# Altium PCB Driver.PcbDoc (part 1 of 4)
Units mm, origin at the board's own origin, x right, y up, seen from the top; angles counter-clockwise.
Board outline 200.2 x 290.2 mm, 2 copper layers (Top Layer, Bottom Layer), stack 1.371 mm thick; 539 components, 196 nets, 1470 pads, 343 vias.
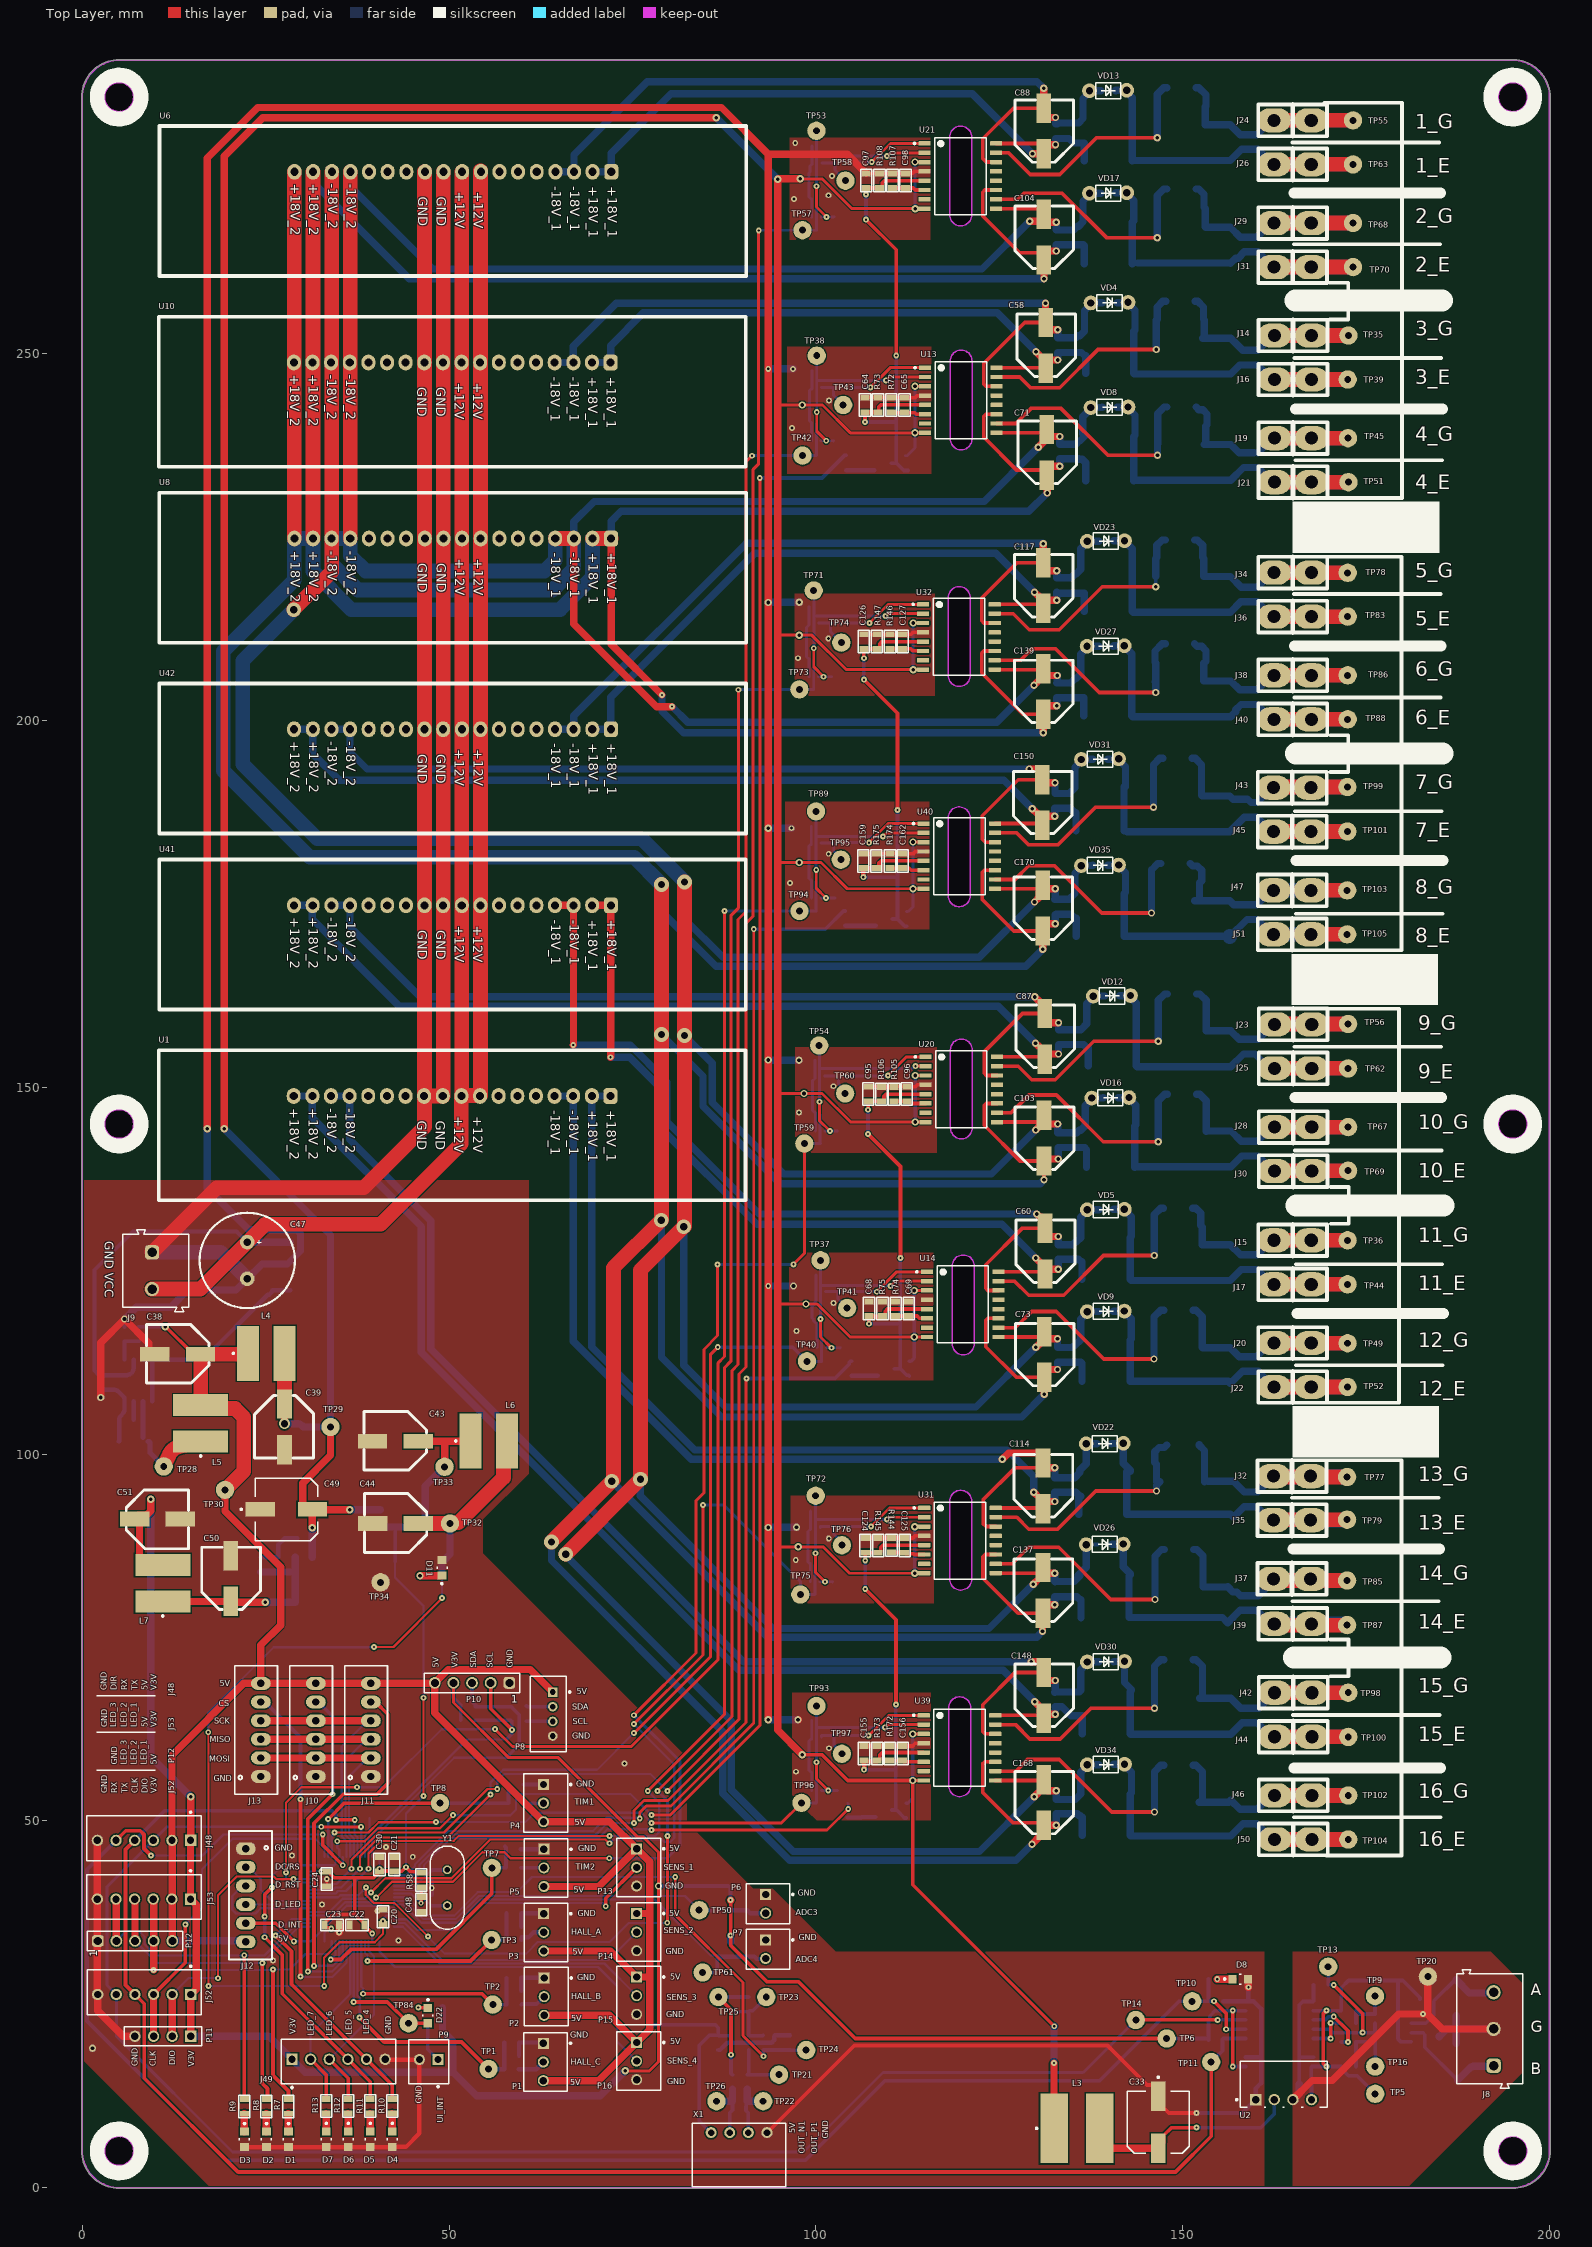
[diagram p0: Top Layer view]
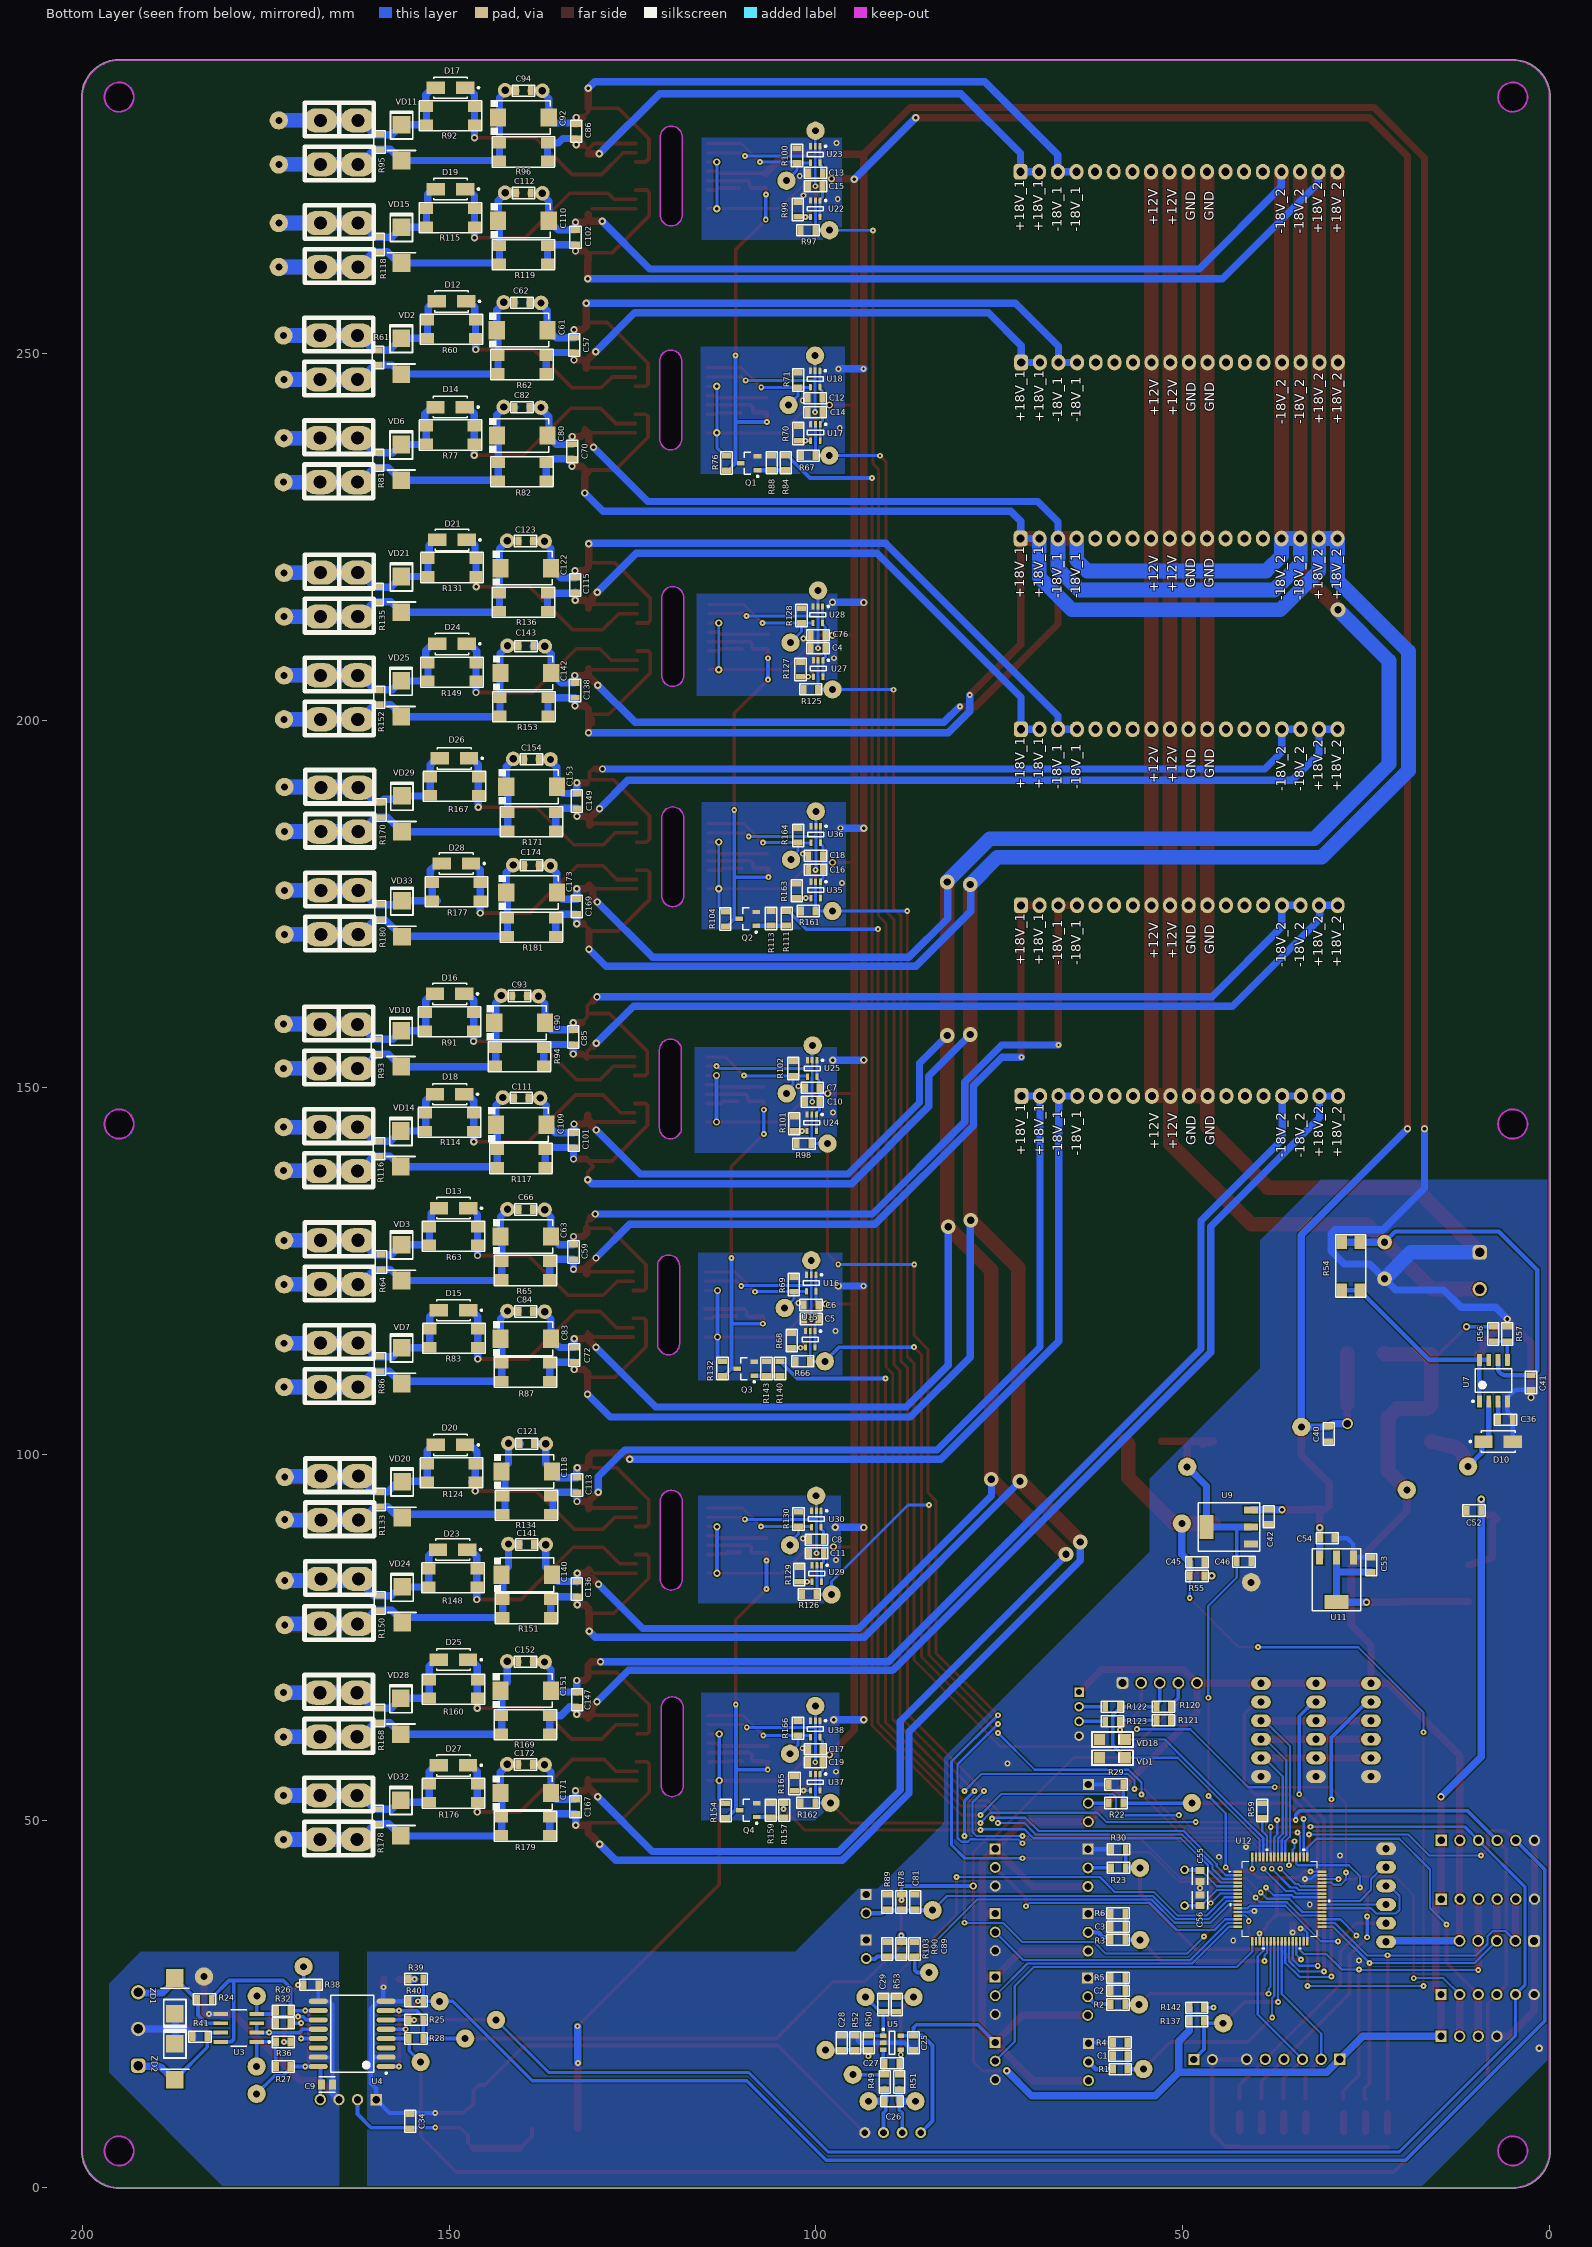
[diagram p1: Bottom Layer view, seen from below]
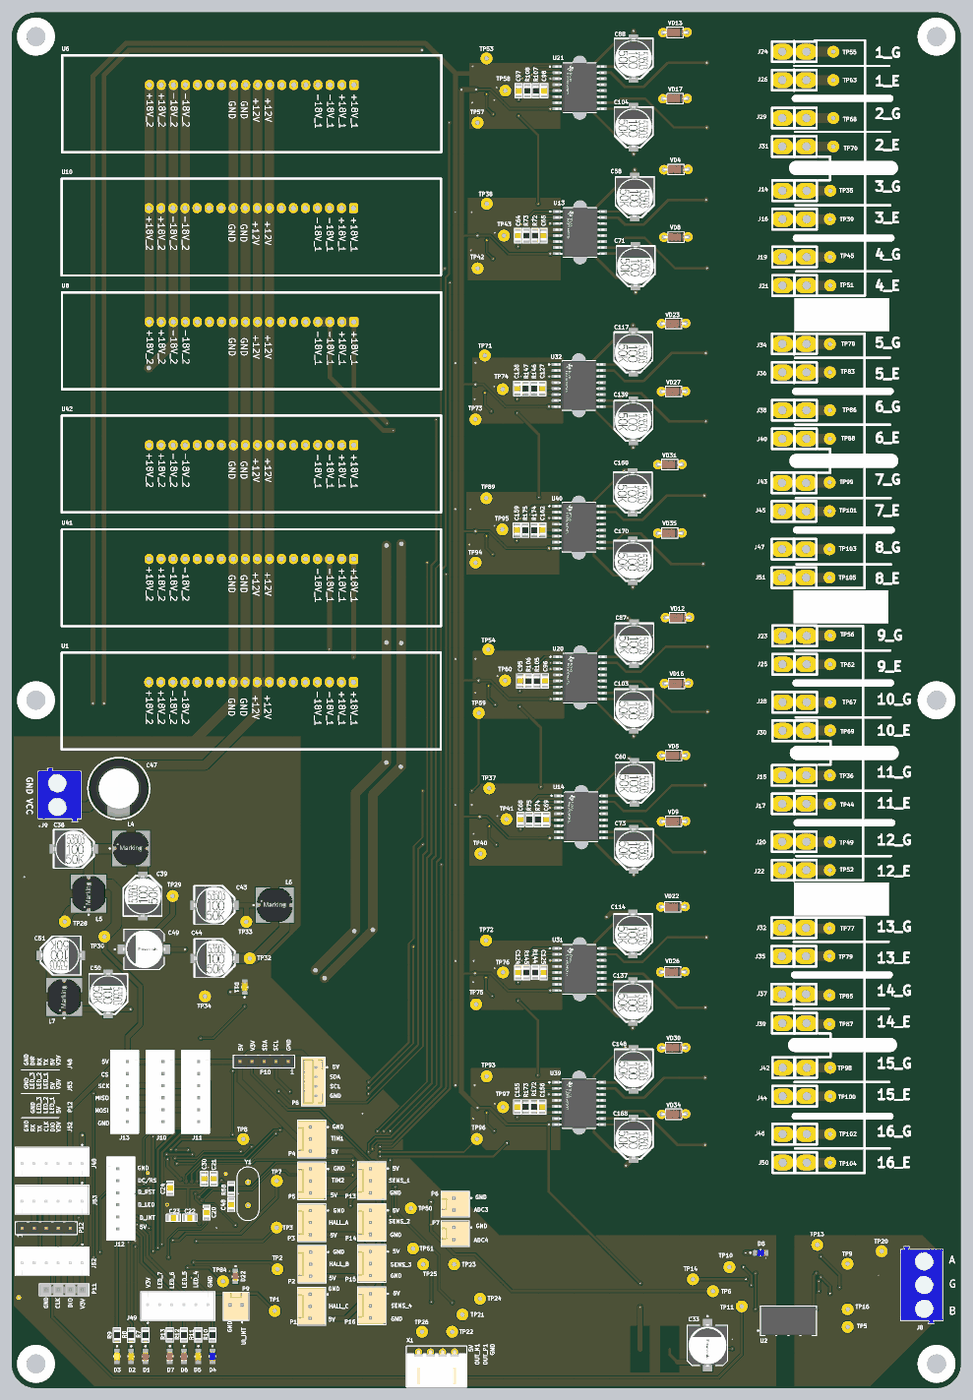
[diagram p5: 3D render of the assembled board from above, using the file's embedded part models]
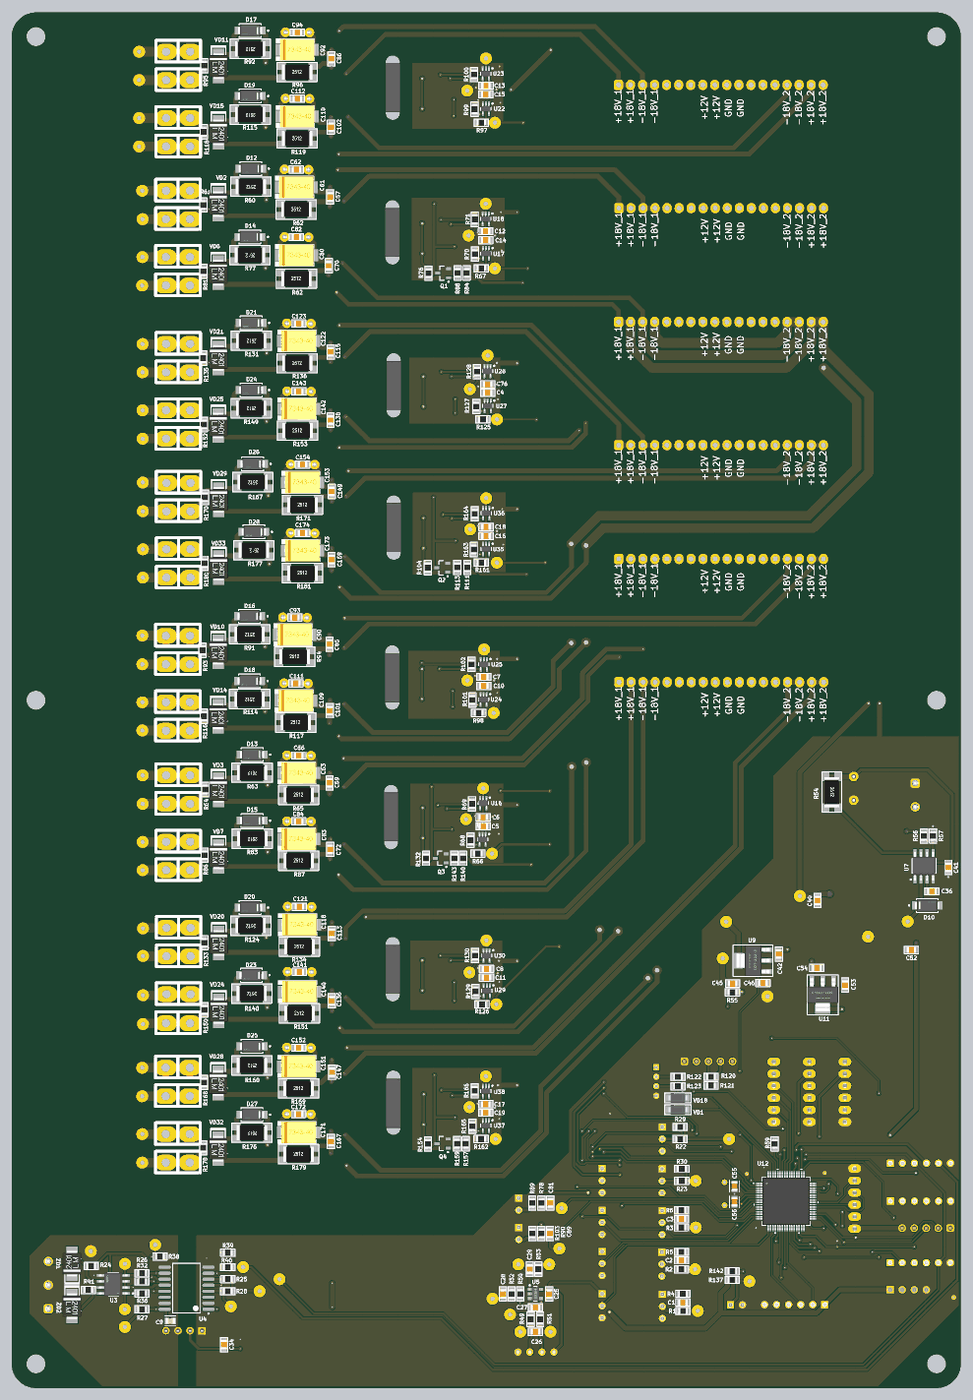
[diagram p6: 3D render of the assembled board from below, using the file's embedded part models]

## Layer stack, top to bottom
Top Solder: solder mask 0.0102, Solder Resist, Dk 3.5
Top Layer: signal copper 0.0356
Dielectric 1: dielectric 1.3, FR-4, Dk 4.8
Bottom Layer: signal copper 0.0356
Bottom Solder: solder mask 0.0102, Solder Resist, Dk 3.5

## Board outline
5,-0.1 cw(c5,5) -0.1,4.994 -0.101,5 -0.1,284.997 -0.1,285 cw(c5,285) 4.997,290.1 5,290.1 195.11,290.1 195.128,290.099 cw(c195,285) 200.1,285.004 200.1,285 200.1,5.003 200.1,5 cw(c195,5) 195,-0.1 194.998,-0.1
cut-out: 193,5 ccw(c195,5) 195,3 ccw(c195,5) 197,5 ccw(c195,5) 195,7 ccw(c195,5)
cut-out: 5,3 cw(c5,5) 3,5 cw(c5,5) 5,7 cw(c5,5) 7,5 cw(c5,5)
cut-out: 5,143 cw(c5,145) 3,145 cw(c5,145) 5,147 cw(c5,145) 7,145 cw(c5,145)
cut-out: 195,143 cw(c195,145) 193,145 cw(c195,145) 195,147 cw(c195,145) 197,145 cw(c195,145)
cut-out: 5,283 cw(c5,285) 3,285 cw(c5,285) 5,287 cw(c5,285) 7,285 cw(c5,285)
cut-out: 195,283 cw(c195,285) 193,285 cw(c195,285) 195,287 cw(c195,285) 197,285 cw(c195,285)
cut-out: 118.23,268.933 118.23,279.532 cw(c119.73,279.532) 121.23,279.532 121.23,268.933 cw(c119.73,268.933)
cut-out: 118.292,238.418 118.292,249.017 cw(c119.792,249.017) 121.292,249.017 121.292,238.418 cw(c119.792,238.418)
cut-out: 118.03,206.144 118.03,216.743 cw(c119.53,216.743) 121.03,216.743 121.03,206.144 cw(c119.53,206.144)
cut-out: 118.023,176.124 ccw(c119.523,176.124) 121.023,176.124 121.023,186.723 ccw(c119.523,186.723) 118.023,186.723
cut-out: 118.585,115.044 ccw(c120.085,115.044) 121.585,115.044 121.585,125.643 ccw(c120.085,125.643) 118.585,125.643
cut-out: 118.334,144.489 ccw(c119.834,144.489) 121.334,144.489 121.334,155.089 ccw(c119.834,155.089) 118.334,155.089
cut-out: 118.234,82.956 ccw(c119.734,82.956) 121.234,82.956 121.234,93.555 ccw(c119.734,93.555) 118.234,93.555
cut-out: 118.094,54.806 118.094,65.405 cw(c119.594,65.405) 121.094,65.405 121.094,54.806 cw(c119.594,54.806)

## Design rules (kind name [scope] priority, off if disabled: settings)
Clearance HV [InNetClass('All Nets') vs InNetClass('HV')] p1: gap=0.2 ignorepadtopadclearanceinfootprint=TRUE except(0: Text-Text Text-Hole; 0.4: THPad-THPad THPad-Via THPad-Fill THPad-Poly THPad-Region THPad-Text THPad-Hole Via-Via Via-Fill Via-Poly Via-Region Via-Text Via-Hole; 0.5: SMDPad-SMDPad SMDPad-THPad SMDPad-Via SMDPad-Fill SMDPad-Poly SMDPad-Region SMDPad-Text SMDPad-Hole Fill-Fill Fill-Poly Fill-Region Fill-Text Fill-Hole Poly-Poly Poly-Region Poly-Text Poly-Hole Region-Region Region-Text Region-Hole)
Clearance Clearance_1 [All] p2: gap=0.18 ignorepadtopadclearanceinfootprint=TRUE
Clearance GND [InNet('GND')] p3: gap=0.4 ignorepadtopadclearanceinfootprint=TRUE except(0.3: Text-Text Text-Hole)
ComponentClearance [All] p1: gap=-2.254 collisioncheckmode=3 verticalgap=0.254 showdistances=FALSE
DiffPairsRouting [All] p1: maxlimit=0.254 minlimit=0.1 mostfreqgap=0.254 toplayer_minwidth=0.3 toplayer_maxwidth=2 toplayer_prefwidth=0.3 bottomlayer_minwidth=0.3 bottomlayer_maxwidth=2 bottomlayer_prefwidth=0.3 maxuncoupledlength=12.7
Height [All] p1: minheight=0 maxheight=100 prefheight=12.7
HoleSize [All] p1: absolutevalues=TRUE maxlimit=5 minlimit=0.025 maxpercent=80.000 minpercent=20.000
HoleToHoleClearance [All] p1: gap=0 allowstackedmicrovias=TRUE
LayerPairs [All] p1 off: enforce=TRUE
MinimumSolderMaskSliver [All] p1: minsoldermaskwidth=0.01
PlaneClearance [All] p1: clearance=0.4
PlaneConnect [All] p1: planeconnectstyle=Direct reliefexpansion=0.508 reliefentries=4 reliefconductorwidth=0.254 reliefairgap=0.254
PolygonConnect [All] p1: connectstyle=Direct reliefconductorwidth=0.254 reliefentries=4 polygonreliefangle="90 Angle" airgapwidth=0.254
RoutingCorners [All] p1: cornerstyle=45-Degree minsetback=0.2 maxsetback=0.2
RoutingVias [All] p1: holewidth=0.4 width=0.8 viastyle="Through Hole" minholewidth=0.254 minwidth=0.5 maxholewidth=0.75 maxwidth=1.5
ShortCircuit [All] p1: allowed=TRUE
SilkToSilkClearance [All] p1 off: silktosilkclearance=0.01
SilkToSolderMaskClearance [All] p1: minsilkscreentomaskgap=0 clearancetoexposedcopper=FALSE
SolderMaskExpansion [All] p1: expansion=0 istentingtop=FALSE
UnRoutedNet [All] p1: checkbadconnections=TRUE
Width [All] p1: maxlimit=10 minlimit=0.254 preferedwidth=2
16 further rules are at their usual default settings.

## Components (designator, comment, footprint, x,y, rotation, side; value= is the part's Value field where it differs from the comment)
C1 "330pF" CAP-0805 58.522,17.957 r180 bottom
C2 "330pF" CAP-0805 58.826,26.832 r180 bottom
C3 "330pF" CAP-0805 58.823,35.552 r180 bottom
C4 "0.1uF" CAP-0805 99.701,209.861 r180 bottom
C5 "0.1uF" CAP-0805 100.636,118.419 r180 bottom
C6 "0.1uF" CAP-0805 100.656,120.315 r180 bottom
C7 "0.1uF" CAP-0805 100.507,149.929 r180 bottom
C8 "0.1uF" CAP-0805 99.939,88.336 r180 bottom
C9 "C0805C224K5RACTU" FP-C0805C-DN-MFG 166.646,14.072 r180 bottom value="0.22 μF"
C10 "0.1uF" CAP-0805 100.507,148.029 r180 bottom
C11 "0.1uF" CAP-0805 99.939,86.487 r180 bottom
C12 "0.1uF" CAP-0805 100.141,243.961 r180 bottom
C13 "0.1uF" CAP-0805 100.067,274.668 r180 bottom
C14 "0.1uF" CAP-0805 100.112,242.041 r180 bottom
C15 "0.1uF" CAP-0805 100.08,272.84 r180 bottom
C16 "0.1uF" CAP-0805 100.044,179.652 r180 bottom
C17 "0.1uF" CAP-0805 100.084,59.77 r180 bottom
C18 "0.1uF" CAP-0805 100.044,181.555 r180 bottom
C19 "0.1uF" CAP-0805 100.084,57.98 r180 bottom
C20 "CAP-NON-POLAR" CAP-0805 40.991,36.924 r270 top
C21 "CAP-NON-POLAR" CAP-0805 42.505,44.073 r90 top
C22 "CAP-NON-POLAR" CAP-0805 37.453,35.797 r180 top
C23 "CAP-NON-POLAR" CAP-0805 34.007,35.798 r0 top
C24 "CAP-NON-POLAR" CAP-0805 33.316,42.076 r270 top
C25 "0.1uF" CAP-0805 86.703,19.755 r90 bottom locked
C26 "0.1uF" CAP-0805 89.63,11.775 r0 bottom locked
C27 "0.1uF" CAP-0805 89.63,16.932 r0 bottom locked
C28 "1000pF" CAP-0805 96.469,19.749 r270 bottom locked
C29 "0.1uF" CAP-0805 90.81,24.975 r270 bottom locked
C30 "CAP-NON-POLAR" CAP-0805 40.507,44.073 r90 top
C33 "1000uF_10V" CAP_SMD_Size_G 146.675,8.901 r270 top locked
C34 "CAP-NON-POLAR" CAP-0805 155.325,9.05 r270 bottom
C36 "470pF" CAP-0805 6.005,104.691 r180 bottom
C38 "330uF 16V" CAP_SMD_Size_E 12.925,113.629 r0 top
C39 "1000uF 6.3V" CAP_SMD_Size_E 27.55,103.647 r90 top locked
C40 "0.1uF" CAP-0805 30.1,102.739 r90 bottom
C41 "0.47uF" CAP-0805 2.52,109.749 r270 bottom
C42 "0.1uF" CAP-0805 38.27,91.459 r90 bottom
C43 "1000uF_6.3V" CAP_SMD_Size_E 42.59,101.759 r0 top
C44 "1000uF_6.3V" CAP_SMD_Size_E 42.63,90.534 r0 top
C45 "0.1uF" CAP-0805 48.035,85.247 r0 bottom
C46 "0.1uF" CAP-0805 41.63,85.339 r0 bottom
C47 "25V_2200uF" CAPPOL-12x25 22.475,126.4 r270 top
C48 "0.1uF" CAP-0805 46.195,38.594 r90 top
C49 "1000uF_10V" CAP_SMD_Size_G 27.81,92.459 r0 top locked
C50 "1000uF_6.3V" CAP_SMD_Size_E 20.21,83.109 r270 top locked
C51 "1000uF_6.3V" CAP_SMD_Size_E 10.3,91.159 r180 top
C52 "0.1uF" CAP-0805 10.3,92.302 r180 bottom
C53 "0.1uF" CAP-0805 24.31,84.919 r270 bottom
C54 "0.1uF" CAP-0805 30.29,88.539 r0 bottom
C55 "16pF" FP-GRM21B-0_1-IPC_C 47.627,42.476 r270 bottom
C56 "16pF" FP-GRM21B-0_1-IPC_C 47.627,39.186 r90 bottom
C57 "CAP-NON-POLAR" CAP-0805 132.942,251.188 r270 bottom
C58 "100uF_50V" CAP_SMD_Size_E 131.322,251.228 r270 top
C59 "CAP-NON-POLAR" CAP-0805 133.056,127.559 r270 bottom
C60 "100uF_50V" CAP_SMD_Size_E 131.236,127.719 r270 top
C61 "CAP-POLAR" CAP-TAN-D 140.056,253.233 r180 bottom
C62 "CAP-NON-POLAR" CAP-0805 140.056,256.956 r0 bottom
C63 "CAP-POLAR" CAP-TAN-D 139.556,129.659 r180 bottom
C64 "CAP-NON-POLAR" CAP-0805 106.683,243.012 r270 top
C65 "CAP-NON-POLAR" CAP-0805 112.072,243.012 r270 top
C66 "CAP-NON-POLAR" CAP-0805 139.556,133.339 r0 bottom
C68 "CAP-NON-POLAR" CAP-0805 107.238,119.824 r270 top
C69 "CAP-NON-POLAR" CAP-0805 112.645,119.824 r270 top
C70 "CAP-NON-POLAR" CAP-0805 133.222,236.678 r270 bottom
C71 "100uF_50V" CAP_SMD_Size_E 131.472,236.628 r270 top
C72 "CAP-NON-POLAR" CAP-0805 132.926,113.529 r270 bottom
C73 "100uF_50V" CAP_SMD_Size_E 131.126,113.634 r270 top
C76 "0.1uF" CAP-0805 99.701,211.641 r180 bottom
C80 "CAP-POLAR" CAP-TAN-D 140.042,238.868 r180 bottom
C81 "330pF" CAP-0805 86.478,38.931 r270 bottom
C82 "CAP-NON-POLAR" CAP-0805 140.056,242.698 r0 bottom
C83 "CAP-POLAR" CAP-TAN-D 139.556,115.734 r180 bottom
C84 "CAP-NON-POLAR" CAP-0805 139.556,119.449 r0 bottom
C85 "CAP-NON-POLAR" CAP-0805 133.064,156.839 r270 bottom
C86 "CAP-NON-POLAR" CAP-0805 132.68,280.343 r270 bottom
C87 "100uF_50V" CAP_SMD_Size_E 131.194,157.019 r270 top
C88 "100uF_50V" CAP_SMD_Size_E 131.05,280.435 r270 top
C89 "330pF" CAP-0805 86.548,32.505 r270 bottom
C90 "CAP-POLAR" CAP-TAN-D 140.394,158.799 r180 bottom
C92 "CAP-POLAR" CAP-TAN-D 139.87,282.223 r180 bottom
C93 "CAP-NON-POLAR" CAP-0805 140.394,162.459 r0 bottom
C94 "CAP-NON-POLAR" CAP-0805 139.87,285.883 r0 bottom
C95 "CAP-NON-POLAR" CAP-0805 107.144,149.079 r270 top
C96 "CAP-NON-POLAR" CAP-0805 112.404,149.079 r270 top
C97 "CAP-NON-POLAR" CAP-0805 106.847,273.603 r270 top
C98 "CAP-NON-POLAR" CAP-0805 112.22,273.603 r270 top
C101 "CAP-NON-POLAR" CAP-0805 133.004,142.789 r270 bottom
C102 "CAP-NON-POLAR" CAP-0805 132.77,265.883 r270 bottom
C103 "100uF_50V" CAP_SMD_Size_E 131.104,143.139 r270 top
C104 "100uF_50V" CAP_SMD_Size_E 131.05,265.973 r270 top
C109 "CAP-POLAR" CAP-TAN-D 140.174,144.895 r180 bottom
C110 "CAP-POLAR" CAP-TAN-D 139.87,268.143 r180 bottom
C111 "CAP-NON-POLAR" CAP-0805 140.174,148.559 r0 bottom
C112 "CAP-NON-POLAR" CAP-0805 139.87,271.913 r0 bottom
C113 "CAP-NON-POLAR" CAP-0805 132.574,95.793 r270 bottom
C114 "100uF_50V" CAP_SMD_Size_E 130.954,95.745 r270 top
C115 "CAP-NON-POLAR" CAP-0805 132.81,218.484 r270 bottom
C117 "100uF_50V" CAP_SMD_Size_E 131,218.464 r270 top
C118 "CAP-POLAR" CAP-TAN-D 139.414,97.635 r180 bottom
C121 "CAP-NON-POLAR" CAP-0805 139.414,101.425 r0 bottom
C122 "CAP-POLAR" CAP-TAN-D 139.57,220.784 r180 bottom
C123 "CAP-NON-POLAR" CAP-0805 139.57,224.474 r0 bottom
C124 "CAP-NON-POLAR" CAP-0805 106.734,87.555 r270 top
C125 "CAP-NON-POLAR" CAP-0805 112.104,87.555 r270 top
C126 "CAP-NON-POLAR" CAP-0805 106.54,210.758 r270 top
C127 "2.2nF" CAP-0805 111.82,210.759 r270 top
C136 "CAP-NON-POLAR" CAP-0805 132.584,81.605 r270 bottom
C137 "100uF_50V" CAP_SMD_Size_E 130.954,81.482 r270 top
C138 "CAP-NON-POLAR" CAP-0805 132.85,204.114 r270 bottom
C139 "100uF_50V" CAP_SMD_Size_E 131,204.034 r270 top
C140 "CAP-POLAR" CAP-TAN-D 139.414,83.535 r180 bottom
C141 "CAP-NON-POLAR" CAP-0805 139.414,87.685 r0 bottom
C142 "CAP-POLAR" CAP-TAN-D 139.54,206.483 r180 bottom
C143 "CAP-NON-POLAR" CAP-0805 139.54,210.153 r0 bottom
C147 "CAP-NON-POLAR" CAP-0805 132.538,66.509 r270 bottom
C148 "100uF_50V" CAP_SMD_Size_E 131.074,67.175 r270 top
C149 "CAP-NON-POLAR" CAP-0805 132.593,189.054 r270 bottom
C150 "100uF_50V" CAP_SMD_Size_E 130.873,188.894 r270 top
C151 "CAP-POLAR" CAP-TAN-D 139.574,67.759 r180 bottom
C152 "CAP-NON-POLAR" CAP-0805 139.574,71.689 r0 bottom
C153 "CAP-POLAR" CAP-TAN-D 138.763,190.964 r180 bottom
C154 "CAP-NON-POLAR" CAP-0805 138.763,194.724 r0 bottom
C155 "CAP-NON-POLAR" CAP-0805 106.564,59.205 r270 top
C156 "CAP-NON-POLAR" CAP-0805 111.824,59.205 r270 top
C159 "CAP-NON-POLAR" CAP-0805 106.463,180.879 r270 top
C162 "CAP-NON-POLAR" CAP-0805 111.843,180.879 r270 top
C167 "CAP-NON-POLAR" CAP-0805 132.774,51.915 r270 bottom
C168 "100uF_50V" CAP_SMD_Size_E 131.074,52.555 r270 top
C169 "CAP-NON-POLAR" CAP-0805 132.623,174.654 r270 bottom
C170 "100uF_50V" CAP_SMD_Size_E 130.933,174.484 r270 top
C171 "CAP-POLAR" CAP-TAN-D 139.574,53.805 r180 bottom
C172 "CAP-NON-POLAR" CAP-0805 139.574,57.675 r0 bottom
C173 "CAP-POLAR" CAP-TAN-D 138.763,176.564 r180 bottom
C174 "CAP-NON-POLAR" CAP-0805 138.763,180.254 r0 bottom
D1 "151031YS06000" LED_RED 28.081,6.576 r270 top
D2 "151031YS06000" LED_GREEN 25.081,6.576 r270 top
D3 "151031YS06000" LED_YELLOW 22.081,6.576 r270 top
D4 "151031YS06000" LED_BLUE 42.231,6.601 r270 top
D5 "151031YS06000" LED_GREEN 39.231,6.601 r270 top
D6 "151031YS06000" LED_RED 36.231,6.601 r270 top
D7 "151031YS06000" LED_RED 33.231,6.601 r270 top
D8 "LED" LED_BLUE 157.868,28.417 r0 top
D10 "US1G" US1G_SMA 6.98,101.709 r180 bottom
D11 "151031YS06000" LED_GREEN 49.035,84.485 r90 top
D12 "US1G" US1G_SMA 149.672,257.148 r0 bottom
D13 "US1G" US1G_SMA 149.391,133.525 r0 bottom
D14 "US1G" US1G_SMA 149.856,242.738 r0 bottom
D15 "US1G" US1G_SMA 149.406,119.609 r0 bottom
D16 "US1G" US1G_SMA 149.934,162.729 r0 bottom
D17 "US1G" US1G_SMA 149.81,286.273 r0 bottom
D18 "US1G" US1G_SMA 149.934,149.059 r0 bottom
D19 "US1G" US1G_SMA 149.81,272.463 r0 bottom
D20 "US1G" US1G_SMA 149.829,101.248 r0 bottom
D21 "US1G" US1G_SMA 149.605,224.619 r0 bottom
D22 "151031YS06000" LED_RED 47.087,23.458 r270 top
D23 "US1G" US1G_SMA 149.524,86.985 r0 bottom
D24 "US1G" US1G_SMA 149.61,210.464 r0 bottom
D25 "US1G" US1G_SMA 149.424,71.975 r0 bottom
D26 "US1G" US1G_SMA 149.293,194.854 r0 bottom
D27 "US1G" US1G_SMA 149.424,57.565 r0 bottom
D28 "US1G" US1G_SMA 149.023,180.514 r0 bottom
J8 "" 691101710003 191.888,21.627 r90 top
J9 "691101710002" 691101710002 10,125 r270 top locked
J10 "B6B-XH-TW" B6B-XH-TW 31.193,62.387 r90 top
J11 "B6B-XH-TW" B6B-XH-TW 38.693,62.387 r90 top
J12 "B6B-XH-TW" B6B-XH-TW 22.907,39.857 r270 top
J13 "B6B-XH-TW" B6B-XH-TW 23.693,62.387 r90 top
J14 "G(4)" Klema_PCB_15A 165.042,252.498 r180 top
J15 "G" Klema_PCB_15A 164.986,129.149 r180 top
J16 "E(5)" Klema_PCB_15A 165.042,246.498 r180 top
J17 "E" Klema_PCB_15A 164.986,123.149 r180 top
J19 "G(6)" Klema_PCB_15A 165.042,238.498 r180 top
J20 "G" Klema_PCB_15A 164.986,115.149 r180 top
J21 "E(7)" Klema_PCB_15A 165.042,232.498 r180 top
J22 "E" Klema_PCB_15A 164.986,109.149 r180 top
J23 "G" Klema_PCB_15A 165.054,158.579 r180 top
J24 "G" Klema_PCB_15A 164.99,281.823 r180 top
J25 "E" Klema_PCB_15A 165.054,152.579 r180 top
J26 "E" Klema_PCB_15A 164.99,275.823 r180 top
J28 "G" Klema_PCB_15A 165.054,144.579 r180 top
J29 "G" Klema_PCB_15A 164.99,267.823 r180 top
J30 "E" Klema_PCB_15A 165.054,138.579 r180 top
J31 "E" Klema_PCB_15A 164.99,261.823 r180 top
J32 "G" Klema_PCB_15A 164.914,96.985 r180 top
J34 "G" Klema_PCB_15A 165,220.174 r180 top
J35 "E" Klema_PCB_15A 164.914,90.985 r180 top
J36 "E" Klema_PCB_15A 165,214.174 r180 top
J37 "G" Klema_PCB_15A 164.914,82.985 r180 top
J38 "G" Klema_PCB_15A 165,206.174 r180 top
J39 "E" Klema_PCB_15A 165.024,76.855 r180 top
J40 "E" Klema_PCB_15A 165,200.174 r180 top
J42 "G" Klema_PCB_15A 165.074,67.465 r180 top
J43 "G" Klema_PCB_15A 164.933,190.854 r180 top
J44 "E" Klema_PCB_15A 165.074,61.465 r180 top
J45 "E" Klema_PCB_15A 164.933,184.854 r180 top
J46 "G" Klema_PCB_15A 165.074,53.465 r180 top
J47 "G" Klema_PCB_15A 164.933,176.854 r180 top
J48 "" Sullins_SWR25X-NRTC-S06-ST-BA_MFG 8.397,47.632 r180 top
J49 "" Sullins_SWR25X-NRTC-S06-ST-BA_MFG 34.927,17.196 r0 top
J50 "E" Klema_PCB_15A 165.074,47.465 r180 top
J51 "E" Klema_PCB_15A 164.933,170.854 r180 top
J52 "" Sullins_SWR25X-NRTC-S06-ST-BA_MFG 8.432,26.632 r180 top
J53 "" Sullins_SWR25X-NRTC-S06-ST-BA_MFG 8.387,39.632 r180 top
L3 "744776227" WE-PD2_1054 1405.585,1278.074 r0 top
L4 "744776227" WE-PD2_7850 25.05,113.729 r0 top
L5 "220uH" WE-PD2_7850 16.12,104.209 r90 top
L6 "1000µH, 0.3A" WE-PD2_7850 55.38,101.789 r0 top
L7 "1000µH, 0.3A" WE-PD2_7850 10.96,82.399 r90 top
P1 "61900311121" 61900311121 63.142,17.127 r90 top
P2 "61900311121" 61900311121 63.243,26.027 r90 top
P3 "61900311121" 61900311121 63.193,34.802 r90 top
P4 "61900311121" 61900311121 63.167,52.421 r90 top
P5 "61900311121" 61900311121 63.217,43.591 r90 top
P6 "61900211121" 61900211121 93.453,38.695 r90 top
P7 "61900211121" 61900211121 93.443,32.495 r90 top
P8 "62000411622" 62000411622 63.522,64.561 r90 top
P9 "61900211121" 61900211121 47.217,17.156 r0 top locked
P10 "61300511121" 61300511121 53.122,68.807 r180 top
P11 "TSW-104-08-G-S" SMTC-TSW-104-08-X-S 14.782,20.632 r180 top
P12 "61300511121" 61300511121 7.177,33.632 r0 top
P13 "61900311121" 61900311121 75.855,43.65 r90 top
P14 "61900311121" 61900311121 75.855,34.835 r90 top
P15 "61900311121" 61900311121 75.855,26.165 r90 top
P16 "61900311121" 61900311121 75.855,17.25 r90 top
Q1 "BC847C" INF-SOT23_N 109.1,235.097 r0 bottom
Q2 "BC847C" INF-SOT23_N 109.291,172.957 r0 bottom
Q3 "BC847C" INF-SOT23_N 109.566,111.654 r0 bottom
Q4 "BC847C" INF-SOT23_N 109.229,51.47 r0 bottom
R1 "10K" RES-0805 58.511,16.147 r180 bottom
R2 "10K" RES-0805 58.826,24.951 r180 bottom
R3 "10K" RES-0805 58.823,33.784 r180 bottom
R4 "10K" RES-0805 58.522,19.787 r0 bottom
R5 "10K" RES-0805 58.826,28.62 r0 bottom
R6 "10K" RES-0805 58.823,37.384 r0 bottom
R7 "220" RES-0805 28.081,11.076 r90 top
R8 "220" RES-0805 25.081,11.076 r90 top
R9 "220" RES-0805 22.081,11.076 r90 top
R10 "220" RES-0805 42.231,11.101 r90 top
R11 "220" RES-0805 39.231,11.101 r90 top
R12 "220" RES-0805 36.231,11.101 r90 top
R13 "220" RES-0805 33.231,11.101 r90 top
R22 "20K" RES-0805 59.087,52.421 r180 bottom
R23 "20K" RES-0805 58.757,43.591 r180 bottom
R24 "10K" RES-0805 183.358,25.657 r180 bottom
R25 "10K" RES-0805 154.528,22.862 r180 bottom
R26 "10K" RES-0805 172.618,24.132 r180 bottom
R27 "10K" RES-0805 172.618,16.517 r180 bottom
R28 "10K" RES-0805 154.528,20.322 r180 bottom
R29 "30K" RES-0805 59.087,54.961 r180 bottom
R30 "30K" RES-0805 58.757,46.131 r180 bottom
R32 "100" RES-0805 172.618,22.402 r180 bottom
R36 "100" RES-0805 172.618,19.862 r180 bottom
R38 "10K" RES-0805 168.838,27.637 r0 bottom
R39 "220" RES-0805 154.528,28.437 r180 bottom
R40 "10K" RES-0805 154.528,25.402 r180 bottom
R41 "10K" RES-0805 183.958,20.587 r180 bottom
R49 "10K" RES-0805 90.63,14.405 r90 bottom locked
R50 "1K" RES-0805 92.81,19.755 r90 bottom locked
R51 "10K" RES-0805 88.62,14.405 r90 bottom locked
R52 "47K" RES-0805 94.65,19.755 r90 bottom locked
R53 "10K" RES-0805 89,24.975 r270 bottom locked
R54 "0.33" RES-2512 27.1,125.6 r270 bottom
R55 "220" RES-0805 48.065,83.377 r0 bottom
R56 "3.8K" RES-0805 7.64,116.369 r270 bottom
R57 "1.2K" RES-0805 5.74,116.369 r270 bottom
R58 "10K" RES-0805 46.195,41.924 r90 top
R59 "10K" RES-0805 39.159,51.407 r270 bottom
R60 "10" RES-2512 149.672,253.358 r0 bottom
R61 "10K" RES-0805 159.692,249.478 r90 bottom
R62 "1K" RES-2512 140.056,248.538 r180 bottom
R63 "10" RES-2512 149.411,129.725 r0 bottom
R64 "10K" RES-0805 159.296,126.169 r90 bottom
R65 "1K" RES-2512 139.556,125.024 r180 bottom
R66 "10K" RES-0805 101.785,112.644 r180 bottom
R67 "10K" RES-0805 101.051,236.121 r180 bottom
R68 "10K" RES-0805 103.309,115.484 r270 bottom
R69 "10K" RES-0805 103.006,123.139 r270 bottom
R70 "10K" RES-0805 102.391,239.141 r270 bottom
R71 "10K" RES-0805 102.421,246.431 r270 bottom
R72 "100K" RES-0805 110.263,243.012 r270 top
R73 "10K" RES-0805 108.473,243.022 r270 top
R74 "100K" RES-0805 110.868,119.824 r270 top
R75 "10K" RES-0805 109.065,119.824 r270 top
R76 "3K" RES-0805 112.187,235.097 r270 bottom
R77 "10" RES-2512 149.856,238.928 r0 bottom
R78 "10K" RES-0805 88.349,38.931 r90 bottom
R81 "10K" RES-0805 159.672,235.498 r90 bottom
R82 "1K" RES-2512 140.042,233.928 r180 bottom
R83 "10" RES-2512 149.376,115.799 r0 bottom
R84 "1K" RES-0805 104.119,235.147 r270 bottom
R86 "10K" RES-0805 159.426,112.289 r90 bottom
R87 "1K" RES-2512 139.556,111.139 r180 bottom
R88 "10K" RES-0805 106.04,235.147 r90 bottom
R89 "47K" RES-0805 90.278,38.931 r90 bottom
R90 "10K" RES-0805 88.368,32.505 r90 bottom
R91 "10" RES-2512 149.934,158.919 r0 bottom
R92 "10" RES-2512 149.81,282.443 r0 bottom
R93 "10K" RES-0805 159.854,155.549 r90 bottom
R94 "1K" RES-2512 140.394,154.179 r180 bottom
R95 "10K" RES-0805 159.5,278.873 r90 bottom
R96 "1K" RES-2512 139.87,277.513 r180 bottom
R97 "10K" RES-0805 101.06,266.847 r180 bottom
R98 "10K" RES-0805 101.614,142.329 r180 bottom
R99 "10K" RES-0805 102.46,269.686 r270 bottom
R100 "10K" RES-0805 102.59,277.027 r270 bottom
R101 "10K" RES-0805 102.934,145.039 r270 bottom
R102 "10K" RES-0805 103.1,152.569 r270 bottom
R103 "47K" RES-0805 90.268,32.505 r90 bottom
R104 "3K" RES-0805 112.348,172.957 r270 bottom
R105 "100K" RES-0805 110.654,149.049 r270 top
R106 "10K" RES-0805 108.934,149.049 r270 top
R107 "100K" RES-0805 110.45,273.603 r270 top
R108 "10K" RES-0805 108.667,273.603 r270 top
R111 "1K" RES-0805 103.989,173.037 r270 bottom
R113 "10K" RES-0805 106.122,173.037 r90 bottom
R114 "10" RES-2512 149.934,145.249 r0 bottom
R115 "10" RES-2512 149.81,268.563 r0 bottom
R116 "10K" RES-0805 159.564,141.629 r90 bottom
R117 "1K" RES-2512 140.174,140.299 r180 bottom
R118 "10K" RES-0805 159.59,264.903 r90 bottom
R119 "1K" RES-2512 139.87,263.513 r180 bottom
R120 "10K" RES-0805 52.592,65.561 r180 bottom
R121 "10K" RES-0805 52.592,63.711 r180 bottom
R122 "10E" RES-0805 59.552,65.561 r0 bottom
R123 "10E" RES-0805 59.552,63.561 r0 bottom
R124 "10" RES-2512 149.709,97.428 r0 bottom
R125 "10K" RES-0805 100.701,204.251 r180 bottom
R126 "10K" RES-0805 100.899,80.857 r180 bottom
R127 "10K" RES-0805 102.101,206.976 r270 bottom
R128 "10K" RES-0805 101.961,214.311 r270 bottom
R129 "10K" RES-0805 102.269,83.587 r270 bottom
R130 "10K" RES-0805 102.383,91.137 r270 bottom
R131 "10" RES-2512 149.605,220.869 r0 bottom
R132 "3K" RES-0805 112.723,111.654 r270 bottom
R133 "10K" RES-0805 159.484,93.815 r90 bottom
R134 "1K" RES-2512 139.414,93.025 r180 bottom
R135 "10K" RES-0805 159.73,217.184 r90 bottom
R136 "1K" RES-2512 139.86,216.114 r180 bottom
R137 "10K" RES-0805 48.087,22.696 r180 bottom
R140 "1K" RES-0805 104.905,111.654 r270 bottom
R142 "220" RES-0805 48.087,24.536 r0 bottom
R143 "10K" RES-0805 106.745,111.654 r90 bottom
R144 "100K" RES-0805 110.314,87.575 r270 top
R145 "10K" RES-0805 108.484,87.555 r270 top
R146 "100K" RES-0805 110.095,210.764 r270 top
R147 "10K" RES-0805 108.315,210.764 r270 top
R148 "10" RES-2512 149.494,83.115 r0 bottom
R149 "10" RES-2512 149.61,206.614 r0 bottom
R150 "10K" RES-0805 159.464,79.685 r90 bottom
R151 "1K" RES-2512 139.414,78.945 r180 bottom
R152 "10K" RES-0805 159.55,203.184 r90 bottom
R153 "1K" RES-2512 139.8,201.873 r180 bottom
R154 "3K" RES-0805 112.309,51.39 r270 bottom
R157 "1K" RES-0805 104.329,51.45 r270 bottom
R159 "10K" RES-0805 106.159,51.45 r90 bottom
R160 "10" RES-2512 149.424,67.965 r0 bottom
R161 "10K" RES-0805 101.044,174.042 r180 bottom
R162 "10K" RES-0805 101.084,52.45 r180 bottom
R163 "10K" RES-0805 102.627,176.802 r270 bottom
R164 "10K" RES-0805 102.427,184.352 r270 bottom
R165 "10K" RES-0805 102.914,55.11 r270 bottom
R166 "10K" RES-0805 102.444,62.62 r270 bottom
R167 "10" RES-2512 149.293,191.024 r0 bottom
R168 "10K" RES-0805 159.524,64.355 r90 bottom
R169 "1K" RES-2512 139.574,63.119 r180 bottom
R170 "10K" RES-0805 159.333,187.824 r90 bottom
R171 "1K" RES-2512 138.733,186.224 r180 bottom
R172 "100K" RES-0805 110.063,59.205 r270 top
R173 "10K" RES-0805 108.34,59.205 r270 top
R174 "100K*" RES-0805 110.103,180.879 r270 top
R175 "10K" RES-0805 108.222,180.879 r270 top
R176 "10" RES-2512 149.424,53.765 r0 bottom
R177 "10" RES-2512 149.023,176.674 r0 bottom
R178 "10K" RES-0805 159.714,50.585 r90 bottom
R179 "1K" RES-2512 139.574,49.245 r180 bottom
R180 "10K" RES-0805 159.403,173.884 r90 bottom
R181 "1K" RES-2512 138.763,171.814 r180 bottom
TP1 "" Test_Point 55.372,16.167 r0 top
TP2 "" Test_Point 55.948,24.951 r0 top
TP3 "" Test_Point 55.793,33.754 r0 top
TP5 "Test_Point_PCB" Test_Point 176.248,12.783 r90 top
TP6 "" Test_Point 147.823,20.322 r90 top
TP7 "" Test_Point 55.823,43.591 r90 top
TP8 "" Test_Point 48.75,52.421 r90 top
TP9 "Test_Point_PCB" Test_Point 176.223,26.109 r90 top
TP10 "Test_Point_PCB" Test_Point 151.298,25.402 r90 top
TP11 "Test_Point_PCB" Test_Point 153.888,17.127 r180 top
TP13 "Test_Point_PCB" Test_Point 169.838,30.111 r180 top
TP14 "Test_Point_PCB" Test_Point 143.607,22.85 r180 top
TP16 "" Test_Point 176.248,16.517 r90 top
TP20 "Test_Point_PCB" Test_Point 183.428,28.767 r180 top
TP21 "Test_Point_PCB" Test_Point 94.97,15.395 r90 top locked
TP22 "Test_Point_PCB" Test_Point 92.81,11.775 r90 top locked
TP23 "Test_Point_PCB" Test_Point 93.23,25.975 r90 top locked
TP24 "Test_Point_PCB" Test_Point 98.68,18.745 r90 top locked
TP25 "Test_Point_PCB" Test_Point 86.703,25.975 r90 top locked
TP26 "Test_Point_PCB" Test_Point 86.45,11.775 r90 top locked
TP28 "Test_Point_PCB" Test_Point 11.09,98.319 r90 top
TP29 "Test_Point_PCB" Test_Point 33.83,103.699 r90 top
TP30 "Test_Point_PCB" Test_Point 19.45,95.125 r90 top
TP32 "Test_Point_PCB" Test_Point 50.111,90.534 r270 top
TP33 "Test_Point_PCB" Test_Point 49.38,98.269 r270 top
TP34 "Test_Point_PCB" Test_Point 40.66,82.525 r90 top
TP35 "Test_Point_PCB" Test_Point 172.592,252.498 r90 top
TP36 "Test_Point_PCB" Test_Point 172.486,129.149 r90 top
TP37 "Test_Point_PCB" Test_Point 100.636,126.419 r180 top
TP38 "Test_Point_PCB" Test_Point 100.112,249.741 r180 top
TP39 "Test_Point_PCB" Test_Point 172.502,246.498 r90 top
TP40 "Test_Point_PCB" Test_Point 98.779,112.644 r180 top
TP41 "Test_Point_PCB" Test_Point 104.256,119.909 r180 top
TP42 "Test_Point_PCB" Test_Point 98.181,236.121 r180 top
TP43 "Test_Point_PCB" Test_Point 103.722,243.022 r180 top
TP44 "Test_Point_PCB" Test_Point 172.486,123.149 r90 top
TP45 "Test_Point_PCB" Test_Point 172.542,238.498 r90 top
TP49 "Test_Point_PCB" Test_Point 172.486,115.109 r90 top
TP50 "" Test_Point 84.088,37.815 r270 top
TP51 "Test_Point_PCB" Test_Point 172.592,232.498 r90 top
TP52 "Test_Point_PCB" Test_Point 172.486,109.149 r90 top
TP53 "Test_Point_PCB" Test_Point 100.064,280.407 r180 top
TP54 "Test_Point_PCB" Test_Point 100.444,155.709 r180 top
TP55 "Test_Point_PCB" Test_Point 173.226,281.823 r90 top
TP56 "Test_Point_PCB" Test_Point 172.554,158.639 r90 top
TP57 "Test_Point_PCB" Test_Point 98.17,266.847 r180 top
TP58 "Test_Point_PCB" Test_Point 104.02,273.602 r180 top
TP59 "Test_Point_PCB" Test_Point 98.423,142.329 r180 top
TP60 "Test_Point_PCB" Test_Point 103.984,149.169 r180 top
TP61 "" Test_Point 84.563,29.327 r270 top
TP62 "Test_Point_PCB" Test_Point 172.554,152.579 r90 top
TP63 "Test_Point_PCB" Test_Point 173.226,275.823 r90 top
TP67 "Test_Point_PCB" Test_Point 172.554,144.579 r90 top
TP68 "Test_Point_PCB" Test_Point 173.226,267.823 r90 top
TP69 "Test_Point_PCB" Test_Point 172.554,138.629 r90 top
TP70 "Test_Point_PCB" Test_Point 173.226,261.823 r90 top
TP71 "Test_Point_PCB" Test_Point 99.701,217.731 r180 top
TP72 "Test_Point_PCB" Test_Point 99.966,94.32 r180 top
TP73 "Test_Point_PCB" Test_Point 97.741,204.251 r180 top
TP74 "Test_Point_PCB" Test_Point 103.461,210.623 r180 top
TP75 "Test_Point_PCB" Test_Point 97.871,80.857 r180 top
TP76 "Test_Point_PCB" Test_Point 103.539,87.574 r180 top
TP77 "Test_Point_PCB" Test_Point 172.414,96.875 r90 top
TP78 "Test_Point_PCB" Test_Point 172.5,220.144 r90 top
TP79 "Test_Point_PCB" Test_Point 172.414,91.055 r90 top
TP83 "Test_Point_PCB" Test_Point 172.5,214.174 r90 top
TP84 "Test_Point_PCB" Test_Point 44.475,22.408 r0 top
TP85 "Test_Point_PCB" Test_Point 172.414,82.765 r90 top
TP86 "Test_Point_PCB" Test_Point 172.5,206.174 r90 top
TP87 "Test_Point_PCB" Test_Point 172.414,76.685 r90 top
TP88 "Test_Point_PCB" Test_Point 172.5,200.174 r90 top
TP89 "Test_Point_PCB" Test_Point 100.017,187.622 r180 top
TP93 "Test_Point_PCB" Test_Point 100.084,65.65 r180 top
TP94 "Test_Point_PCB" Test_Point 97.757,174.042 r180 top
TP95 "Test_Point_PCB" Test_Point 103.389,181.033 r180 top
TP96 "Test_Point_PCB" Test_Point 98.024,52.45 r180 top
TP97 "Test_Point_PCB" Test_Point 103.539,59.145 r180 top
TP98 "Test_Point_PCB" Test_Point 172.574,67.465 r90 top
TP99 "Test_Point_PCB" Test_Point 172.453,190.934 r90 top
TP100 "Test_Point_PCB" Test_Point 172.574,61.445 r90 top
TP101 "Test_Point_PCB" Test_Point 172.453,184.874 r90 top
TP102 "Test_Point_PCB" Test_Point 172.574,53.465 r90 top
TP103 "Test_Point_PCB" Test_Point 172.433,176.854 r90 top
TP104 "Test_Point_PCB" Test_Point 172.574,47.455 r90 top
TP105 "Test_Point_PCB" Test_Point 172.433,170.854 r90 top
U1 "DC-DC" DC-DC_Bridge 10.395,150.109 r180 top locked
U2 "B0505S-1W" B0505S-1W 163.758,14.097 r0 top
U3 "MAX485" SOIC-8-MFG 178.688,21.767 r0 bottom
U4 "ADUM1401BRWZ" ADI-RW-16_M 163.218,20.957 r0 bottom
U5 "" SOT-23-5 89.63,19.755 r180 bottom locked
U6 "DC-DC" DC-DC_Bridge 10.505,276.109 r180 top locked
U7 "MC34063" SOIC-8_M 7.64,110.009 r90 bottom
U8 "DC-DC" DC-DC_Bridge 10.485,226.109 r180 top locked
U9 "AMS1117-3v3" SOT-223-3 43.71,90.059 r90 bottom
U10 "DC-DC" DC-DC_Bridge 10.415,250.109 r180 top locked
U11 "AMS1117-3v3" SOT-223-3 29.02,82.869 r0 bottom
U12 "STM32F303RBT6" LQFP64-10x10mm 36.757,39.326 r180 bottom locked
U13 "UCC21520DW" FP-DW0016B-MFG 119.762,243.668 r0 top
U14 "UCC21520DW" FP-DW0016B-MFG 120.016,120.404 r0 top
U15 "74LVC1G14" SOT23-5_N 100.771,115.644 r270 bottom
U16 "74LVC1G14" SOT23-5_N 100.636,123.309 r270 bottom
U17 "74LVC1G14" SOT23-5_N 100.061,239.271 r270 bottom
U18 "74LVC1G14" SOT23-5_N 100.112,246.561 r270 bottom
U20 "UCC21520DW" FP-DW0016B-MFG 119.814,149.709 r0 top
U21 "UCC21520DW" FP-DW0016B-MFG 119.69,274.233 r0 top
U22 "74LVC1G14" SOT23-5_N 100.08,269.777 r270 bottom
U23 "74LVC1G14" SOT23-5_N 100.087,277.182 r270 bottom
U24 "74LVC1G14" SOT23-5_N 100.564,145.169 r270 bottom
U25 "74LVC1G14" SOT23-5_N 100.507,152.569 r270 bottom
U27 "74LVC1G14" SOT23-5_N 99.701,207.101 r270 bottom
U28 "74LVC1G14" SOT23-5_N 99.731,214.431 r270 bottom
U29 "74LVC1G14" SOT23-5_N 99.879,83.717 r270 bottom
U30 "74LVC1G14" SOT23-5_N 99.939,91.137 r270 bottom
U31 "UCC21520DW" FP-DW0016B-MFG 119.644,88.215 r0 top
U32 "UCC21520DW" FP-DW0016B-MFG 119.5,211.394 r0 top
U35 "74LVC1G14" SOT23-5_N 100.027,176.912 r270 bottom
U36 "74LVC1G14" SOT23-5_N 100.017,184.462 r270 bottom
U37 "74LVC1G14" SOT23-5_N 100.084,55.265 r270 bottom
U38 "74LVC1G14" SOT23-5_N 100.084,62.53 r270 bottom
U39 "UCC21520DW" FP-DW0016B-MFG 119.574,59.945 r0 top
U40 "UCC21520DW" FP-DW0016B-MFG 119.553,181.514 r0 top
U41 "DC-DC" DC-DC_Bridge 10.445,176.109 r180 top locked
U42 "DC-DC" DC-DC_Bridge 10.455,200.109 r180 top locked
VD1 "SMF3.3A" SMF3.3A 59.552,58.611 r270 bottom
VD2 "SMBJ18CA" DO-214AA 156.542,247.618 r90 bottom
VD3 "SMBJ18CA" DO-214AA 156.496,124.049 r90 bottom
VD4 "5.1V" DO-35 140.056,256.956 r180 top
VD5 "5.1V" DO-35 139.556,133.339 r180 top
VD6 "SMBJ18CA" DO-214AA 156.542,233.138 r90 bottom
VD7 "SMBJ18CA" DO-214AA 156.486,110.009 r90 bottom
VD8 "5.1V" DO-35 140.056,242.698 r180 top
VD9 "5.1V" DO-35 139.556,119.449 r180 top
VD10 "SMBJ18CA" DO-214AA 156.554,153.189 r90 bottom
VD11 "SMBJ18CA" DO-214AA 156.49,276.723 r90 bottom
VD12 "5.1V" DO-35 140.394,162.459 r180 top
VD13 "5.1V" DO-35 139.87,285.883 r180 top
VD14 "SMBJ18CA" DO-214AA 156.584,139.539 r90 bottom
VD15 "SMBJ18CA" DO-214AA 156.5,262.763 r90 bottom
VD16 "5.1V" DO-35 140.174,148.559 r180 top
VD17 "5.1V" DO-35 139.87,271.913 r180 top
VD18 "SMF3.3A" SMF3.3A 59.552,61.101 r270 bottom
VD20 "SMBJ18CA" DO-214AA 156.414,91.735 r90 bottom
VD21 "SMBJ18CA" DO-214AA 156.51,215.144 r90 bottom
VD22 "5.1V" DO-35 139.414,101.425 r180 top
VD23 "5.1V" DO-35 139.57,224.474 r180 top
VD24 "SMBJ18CA" DO-214AA 156.414,77.395 r90 bottom
VD25 "SMBJ18CA" DO-214AA 156.55,200.904 r90 bottom
VD26 "5.1V" DO-35 139.414,87.685 r180 top
VD27 "5.1V" DO-35 139.54,210.153 r180 top
VD28 "SMBJ18CA" DO-214AA 156.574,62.195 r90 bottom
VD29 "SMBJ18CA" DO-214AA 156.433,185.224 r90 bottom
VD30 "5.1V" DO-35 139.574,71.689 r180 top
VD31 "5.1V" DO-35 138.763,194.724 r180 top
VD32 "SMBJ18CA" DO-214AA 156.574,48.325 r90 bottom
VD33 "SMBJ18CA" DO-214AA 156.433,170.934 r90 bottom
VD34 "5.1V" DO-35 139.574,57.675 r180 top
VD35 "5.1V" DO-35 138.763,180.254 r180 top
X1 "CONN-4-PIN" CONN-PLS-4-2.54mm 85.712,7.493 r0 top locked
Y1 "FOXSLF/120-20" FOX-FOXSLF-2_V 49.737,40.886 r90 top
ZD1 "P6SMB16CA" DO-214AA 187.388,28.197 r270 bottom
ZD2 "P6SMB16CA" DO-214AA 187.388,15.112 r90 bottom

## Footprints (in the part's own frame and the unit in brackets; to place one, negate y for a bottom-side part, rotate by r counter-clockwise, add the part's x,y. Pads: shape width x height; smd on the part's side, far side on the other; paste and mask are expansions set on the pad)
61300511121 [mm] "Pin Header, pitch 2.54 mm, THT, Vertical, single row, 5p"
  rrect50% 1.6x1.6 hole 1.1: 1(-5.08,0)
  round 1.6 hole 1.1: 2(-2.54,0) 3(0,0) 4(2.54,0) 5(5.08,0)
  silkscreen extent -6.5,-1.35 6.5,1.35, body extent -6.35,-1.27 6.35,1.27, height 8.57
61900211121 [mm] "2.54mm Male Locking Header, 2p"
  rect 1.5x1.5 hole 1: 1(1.27,0.3)
  round 1.5 hole 1: 2(-1.27,0.3)
  silkscreen extent -2.71,-3.52 2.71,2.98, body extent -2.54,-2.9 2.54,2.9, height 11.53
61900311121 [mm] "2.54mm Male Locking Header, 3p"
  rect 1.5x1.5 hole 1: 1(2.54,0.3)
  round 1.5 hole 1: 2(0,0.3) 3(-2.54,0.3)
  silkscreen extent -3.98,-3.52 3.98,2.98, body extent -3.81,-2.9 3.81,2.9, height 11.53
62000411622 [mm] "2.00mm Male Vertical Shrouded Header, 4p"
  rect 1.3x1.3 hole 0.8: 1(3,-0.6)
  round 1.3 hole 0.8: 2(1,-0.6) 3(-1,-0.6) 4(-3,-0.6)
  silkscreen extent -5.15,-3.03 5.15,2.45, body extent -5,-2.35 5,2.35, height 6.13
691101710002 [mm] "5,00mm - modular - blue - Horizontal entry with pressure clamp - 12,6mm height - 02p"
  rrect50% 1.95x1.95 hole 1.3: 1(-2.5,-0.5)
  round 1.95 hole 1.3: 2(2.5,-0.5)
  silkscreen extent -5.6,-4.5 5.6,4.5, body extent -5.6,-4.5 5.6,4.5, height 12.65
691101710003 [mm] "5,00mm - modular - blue - Horizontal entry with pressure clamp - 12,6mm height - 03p"
  rrect50% 1.95x1.95 hole 1.3: 1(-5,-0.5)
  round 1.95 hole 1.3: 2(0,-0.5) 3(5,-0.5)
  silkscreen extent -8.1,-4.5 8.1,4.5, body extent -8.1,-4.5 8.1,4.5, height 12.65
ADI-RW-16_M [mm] "SOIC, 16-Leads, Body 10.3x7.5mm, Pitch 1.27mm, IPC Low Density"
  oval 2.6x0.7 smd: 1(-4.625,4.445) 2(-4.625,3.175) 3(-4.625,1.905) 4(-4.625,0.635) 5(-4.625,-0.635) 6(-4.625,-1.905) 7(-4.625,-3.175) 8(-4.625,-4.445) 9(4.625,-4.445) 10(4.625,-3.175) 11(4.625,-1.905) 12(4.625,-0.635) 13(4.625,0.635) 14(4.625,1.905) 15(4.625,3.175) 16(4.625,4.445)
  silkscreen extent -4.75,-5.25 2.93,5.47, body extent -3.8,-5.25 3.8,5.25, height 2.65
B6B-XH-TW [mm]
  oval 1.75x2.7 hole 1: 1(-6.35,-0.635) 2(-3.81,-0.635) 3(-1.27,-0.635) 4(1.27,-0.635) 5(3.81,-0.635) 6(6.35,-0.635)
  silkscreen extent -8.76,-2.92 8.76,2.92, body extent -8.75,-2.88 8.75,2.88, height 6.88
B0505S-1W [mm]
  rect 1.55x1.55 hole 1 paste-2539.97 mask+0: 1(-3.81,-2.1)
  round 1.55 hole 1 paste-2539.97 mask+0: 2(-1.27,-2.1) 3(1.27,-2.1) 4(3.81,-2.1)
  silkscreen extent -6.52,-3.13 5.92,3.13, body extent -6.02,-3.22 6.02,3.22, height 0.25
CAP-0805 [mm]
  rect 0.8x1.25 smd mask+0.015: 1(-1,0) 2(1,0)
  silkscreen extent -1.52,-0.76 1.52,0.76, body extent -1,-0.62 1,0.63, height 0.8
CAP-TAN-D [mm]
  rect 2.2x2.5 smd: 1(-3.45,0) 2(3.45,0)
  silkscreen extent -4.5,-2.4 3.65,2.4, body extent -3.8,-2.3 3.8,2.3, height 4
CAP_SMD_Size_E [mm]
  rect 4x2 smd: 1(3.175,0) 2(-3.048,0)
  silkscreen extent -4.19,-3.94 4.32,4.06, body extent -4.25,-4 4.25,4, height 10.59
CAP_SMD_Size_G [mm]
  rect 4x2 smd paste+0 mask+0: 1(3.55,0) 2(-3.55,0)
  silkscreen extent -6.27,-4.25 4.25,4.25, body extent -5.8,-4.5 5.8,4.5, height 0.25
CAPPOL-12x25 [mm]
  round 2 hole 1: 1(-2.5,0) 2(2.5,0)
  silkscreen extent -6.5,-6.5 6.5,6.5, body extent -6.25,-6.25 6.25,6.25, height 25
CONN-PLS-4-2.54mm [mm]
  round 1.5 hole 0.9: 1(0,0) 2(2.54,0) 3(5.08,0) 4(7.62,0)
  silkscreen extent -2.6,-7.37 10.15,1.25, body extent -2.45,-7.3 10.05,0.3, height 5.9
DC-DC_Bridge [mm]
  rrect50% 1.905x2.159 hole 1.1: 1(-61.595,1.294)
  oval 1.905x2.159 hole 1.1: 2(-59.055,1.294) 3(-56.515,1.294) 4(-53.975,1.294) 5(-51.435,1.294) 6(-48.895,1.294) 7(-46.355,1.294) 8(-43.815,1.294) 9(-41.275,1.294) 10(-38.735,1.294) 11(-36.195,1.294) 12(-33.655,1.294) 13(-31.115,1.294) 14(-28.575,1.294) 15(-26.035,1.294) 16(-23.495,1.294) 17(-20.955,1.294) 18(-18.415,1.294)
  silkscreen extent -80.01,-4.95 -0.01,15.5, body extent -80,-4.89 0,15.5, height 0.25
DO-35 [mm]
  round 2 hole 1: 1(-2.5,-0.05) 2(2.575,0.025)
  silkscreen extent -1.68,-1.1 1.75,1.1, body extent -2.82,-0.9 2.82,0.9, height 1.82
DO-214AA [mm]
  rect 2.4x2.4 smd: 1(-0.381,0) 2(4.5,0)
  silkscreen extent 1.02,-1.91 6.35,1.91, body extent -0.75,-1.97 4.85,1.97, height 2.65
FOX-FOXSLF-2_V [mm] "THD, 2-Leads, Body 11.35x4.65mm, Pitch 4.88mm"
  round 1.2 hole 0.7: 1(-2.44,0) 2(2.44,0)
  silkscreen extent -5.68,-2.32 5.68,2.32, body extent -5.67,-2.32 5.68,2.32, height 3.6
FP-C0805C-DN-MFG [mm]
  rect 0.95x1.35 smd paste+0 mask+0: 1(-0.75,0) 2(0.75,0)
  silkscreen extent -1.1,-1.07 1.1,1.07, body extent -1,-0.63 1,0.63, height 0.88
FP-DW0016B-MFG [mm]
  rrect17% 1.65x0.6 smd paste+0 mask+0: 1(-4.875,4.445) 2(-4.875,3.175) 3(-4.875,1.905) 4(-4.875,0.635) 5(-4.875,-0.635) 6(-4.875,-1.905) 7(-4.875,-3.175) 8(-4.875,-4.445) 9(4.875,-4.445) 10(4.875,-3.175) 11(4.875,-1.905) 12(4.875,-0.635) 13(4.875,0.635) 14(4.875,1.905) 15(4.875,3.175) 16(4.875,4.445)
  silkscreen extent -6.37,-5.25 3.5,5.25, body extent -5.15,-5.15 5.15,5.15, height 2.65
FP-GRM21B-0_1-IPC_C [mm]
  rect 0.958x1.262 smd paste+0 mask+0: 1(-0.727,0) 2(0.727,0)
  silkscreen extent -1.21,-1.07 1.21,1.07, body extent -1,-0.63 1,0.63, height 1.35
INF-SOT23_N [mm] "SOT23, 3-Leads, Body 2.9x1.3 mm, Pitch 0.95 mm, IPC Medium Density"
  rect 1.05x0.6 smd: 1(-1.15,0.95) 2(-1.15,-0.95) 3(1.15,0)
  silkscreen extent -1.27,-1.5 0.7,1.92, body extent -0.7,-1.5 0.7,1.5, height 1.1
Klema_PCB_15A [mil]
  oval 180x130 hole 70: 1(-100,0) 1(100,0)
  silkscreen extent -185,-85 185,85, body extent -161,-16 161,16, height 505
LED_BLUE [mm]
  rect 1.1x1.2 smd paste+0 mask+0: 1(-1.05,0) 2(1.05,0)
  silkscreen extent -2.27,-0.67 0.13,0.67, body extent -1,-0.63 1,0.63, height 0.8
LED_GREEN [mm]
  rect 1.1x1.2 smd paste+0 mask+0: 1(-1.05,0) 2(1.05,0)
  silkscreen extent -2.27,-0.67 0.13,0.67, body extent -1,-0.63 1,0.63, height 0.8
LED_RED [mm]
  rect 1.1x1.2 smd paste+0 mask+0: 1(-1.05,0) 2(1.05,0)
  silkscreen extent -2.27,-0.67 0.13,0.67, body extent -1.7,-0.77 1.7,0.77, height 0.25
LED_YELLOW [mm]
  rect 1.1x1.2 smd paste+0 mask+0: 1(-1.05,0) 2(1.05,0)
  silkscreen extent -2.27,-0.67 0.13,0.67, body extent -1,-0.63 1,0.63, height 0.8
LQFP64-10x10mm [mm]
  rect 1.194x0.305 smd paste+0 mask+0: 1(-5.75,3.75) 2(-5.75,3.25) 3(-5.75,2.75) 4(-5.75,2.25) 5(-5.75,1.75) 6(-5.75,1.25) 7(-5.75,0.75) 8(-5.75,0.25) 9(-5.75,-0.25) 10(-5.75,-0.75) 11(-5.75,-1.25) 12(-5.75,-1.75) 13(-5.75,-2.25) 14(-5.75,-2.75) 15(-5.75,-3.25) 16(-5.75,-3.75) 33(5.75,-3.75) 34(5.75,-3.25) 35(5.75,-2.75) 36(5.75,-2.25) 37(5.75,-1.75) 38(5.75,-1.25) 39(5.75,-0.75) 40(5.75,-0.25) 41(5.75,0.25) 42(5.75,0.75) 43(5.75,1.25) 44(5.75,1.75) 45(5.75,2.25) 46(5.75,2.75) 47(5.75,3.25) 48(5.75,3.75)
  rect 0.305x1.194 smd paste+0 mask+0: 17(-3.75,-5.75) 18(-3.25,-5.75) 19(-2.75,-5.75) 20(-2.25,-5.75) 21(-1.75,-5.75) 22(-1.25,-5.75) 23(-0.75,-5.75) 24(-0.25,-5.75) 25(0.25,-5.75) 26(0.75,-5.75) 27(1.25,-5.75) 28(1.75,-5.75) 29(2.25,-5.75) 30(2.75,-5.75) 31(3.25,-5.75) 32(3.75,-5.75) 49(3.75,5.75) 50(3.25,5.75) 51(2.75,5.75) 52(2.25,5.75) 53(1.75,5.75) 54(1.25,5.75) 55(0.75,5.75) 56(0.25,5.75) 57(-0.25,5.75) 58(-0.75,5.75) 59(-1.25,5.75) 60(-1.75,5.75) 61(-2.25,5.75) 62(-2.75,5.75) 63(-3.25,5.75) 64(-3.75,5.75)
  silkscreen extent -6.93,-6.85 6.85,6.85, body extent -6,-6 6,6, height 1.6
RES-0805 [mm]
  rect 0.8x1.25 smd mask+0.015: 1(-1,0) 2(1,0)
  silkscreen extent -1.52,-0.76 1.52,0.76, body extent -1,-0.62 1,0.63, height 0.6
RES-2512 [mm]
  rect 1.8x1.45 smd: 1(-3.275,-1.225) 1(-3.275,1.225) 2(3.275,-1.225) 2(3.275,1.225)
  silkscreen extent -4.28,-2.05 4.25,2.05, body extent -3.2,-1.6 3.2,1.6, height 0.6
SMF3.3A [mil]
  rect 60x60 smd: 1(0,70) 2(0,-70)
  silkscreen extent -40,-110 40,110, body extent -39,-77 39,77, height 48
SMTC-TSW-104-08-X-S [mm] ".025 SQ Post Terminal Strip Assembly, 1x4 Pins, Vertical, 2.54mm Pitch, Male"
  rect 1.55x1.55 hole 1.02: 1(0,0)
  round 1.55 hole 1.02: 2(2.54,0) 3(5.08,0) 4(7.62,0)
  silkscreen extent -1.46,-1.27 9.08,1.27, body extent -1.27,-1.27 8.89,1.27, height 8.38
SOIC-8-MFG [mm]
  rect 1.98x0.53 smd paste+0 mask+0: 1(-2.465,1.905) 2(-2.465,0.635) 3(-2.465,-0.635) 4(-2.465,-1.905) 5(2.465,-1.905) 6(2.465,-0.635) 7(2.465,0.635) 8(2.465,1.905)
  silkscreen extent -4.27,-2.5 1.1,2.5, body extent -3,-2.45 3,2.45, height 1.75
SOIC-8_M [mm]
  rrect15% 1.65x0.65 smd: 1(-2.825,1.905) 2(-2.825,0.635) 3(-2.825,-0.635) 4(-2.825,-1.905) 5(2.825,-1.905) 6(2.825,-0.635) 7(2.825,0.635) 8(2.825,1.905)
  silkscreen extent -2.95,-2.5 1.6,2.91, body extent -3,-2.45 3,2.45, height 1.63
SOT23-5_N [mm]
  rrect25% 0.85x0.4 smd: 1(-1.125,0.65) 2(-1.125,0) 3(-1.125,-0.65) 4(1.125,-0.65) 5(1.125,0.65)
  silkscreen extent -1.25,-1.1 0.3,1.52, body extent -1.14,-1 1.14,1, height 0.94
SOT-23-5 [mm]
  rect 0.9x0.65 smd: 1(-1.2,0.95) 2(-1.2,0) 3(-1.2,-0.95) 4(1.2,-0.95) 5(1.2,0.95)
  silkscreen extent -1.33,-1.55 0.35,1.95, body extent -1.4,-1.45 1.4,1.45, height 1.24
SOT-223-3 [mm]
  rect 0.95x1.9 smd: 1(-2.3,-3.05) 2(0,-3.05) 3(2.3,-3.05)
  rect 3.25x1.9 smd: 2(0,3.05)
  silkscreen extent -3.3,-4.2 3.3,4.2, body extent -3.25,-3.5 3.25,3.5, height 1.7
Sullins_SWR25X-NRTC-S06-ST-BA_MFG [mm]
  rect 1.55x1.55 hole 1 paste-2539.97 mask+0: 1(-6.35,0.3)
  round 1.55 hole 1 paste-2539.97 mask+0: 2(-3.81,0.3) 3(-1.27,0.3) 4(1.27,0.3) 5(3.81,0.3) 6(6.35,0.3)
  silkscreen extent -7.8,-3.67 7.8,3.05, body extent -7.9,-3.15 7.9,3.15, height 0.25
Test_Point [mm]
  round 2.5 hole 0.95: 1(0,0)
US1G_SMA [mm]
  rect 2.5x1.7 smd paste+0 mask+0: 1(-2,0) 2(2,0)
  silkscreen extent -3.93,-1.46 2.3,1.46, body extent -2.6,-1.3 2.6,1.3, height 2.4
WE-PD2_1054 [mm] "SMD Power Inductor, 2-Leads, body 10x9mm"
  rect 3.75x9.5 smd: 1(-1273.125,-1270) 2(-1266.875,-1270)
  silkscreen extent -1275.62,-1270.12 -1275.37,-1269.88, body extent -1275.04,-1274.5 -1264.96,-1265.5, height 5.43
WE-PD2_7850 [mm] "SMD Power Inductor, 2-Leads, body 7.8x7mm"
  rect 3x7.5 smd: 1(-2.5,0) 2(2.5,0)
  silkscreen extent -4.59,-0.12 -4.34,0.12, body extent -3.81,-3.5 3.81,3.5, height 4.95